# Altium PCB MainBoardPCB_4.PcbDoc (part 19 of 32)
Units mm, origin at the board's own origin, x right, y up, seen from the top; angles counter-clockwise.
Board outline 333.63 x 349.38 mm, 16 copper layers (L1, L2 (GND), L3 (Sign), L4 (GND), L5 (Sign), L6 (PWR/GND), L7(PWR/GND), L8 (Plane_GND), L9 (PWR/GND), L10 (PWR/GND), L11 (PWR/GND), L12 (Sign), L13 (GND), L14 (Sign), L15 (GND), L16), stack 2.502 mm thick; 2205 components, 1648 nets, 8314 pads, 3172 vias.
Unrouted connection lines stored in the file: 5141.
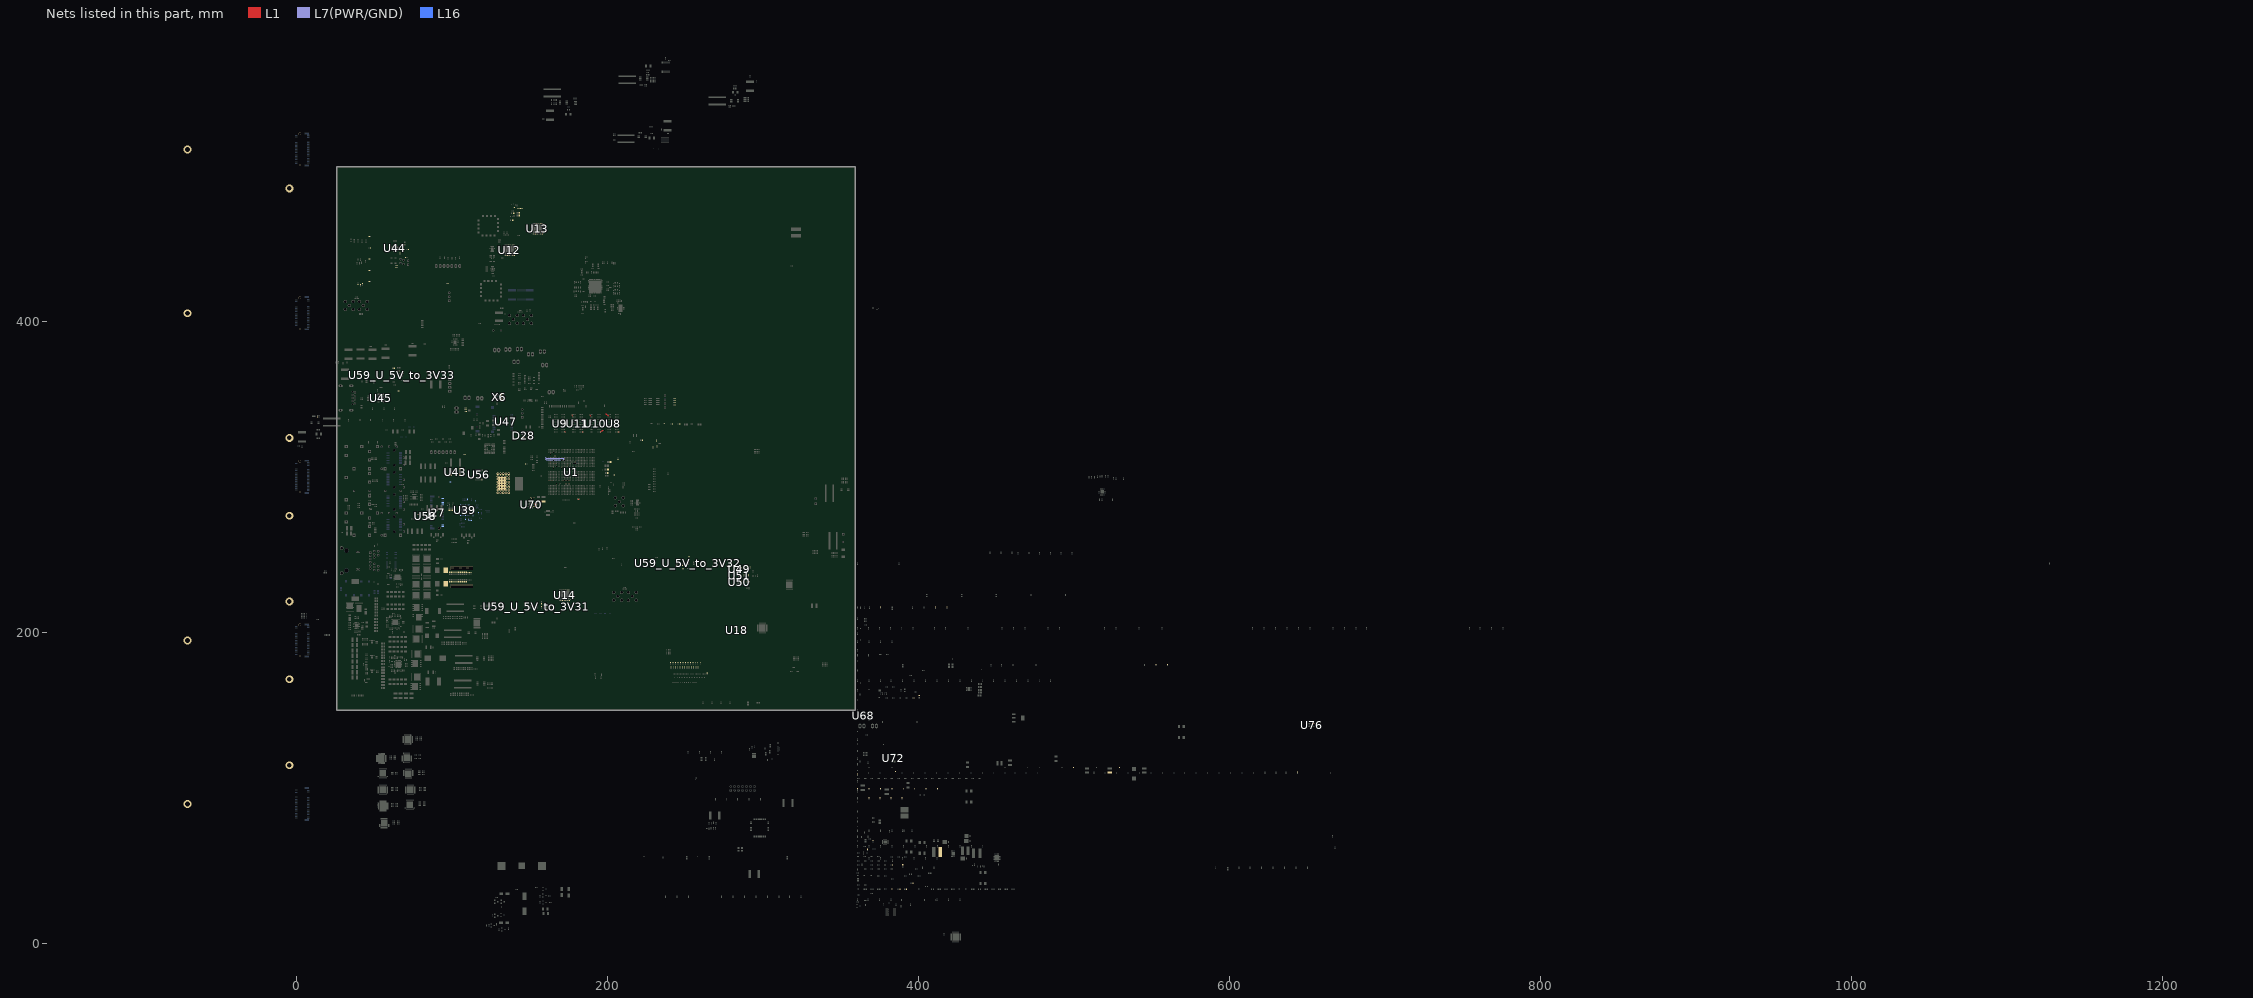
[diagram p21: the nets of this part, all layers, seen from the top]

## Part data (continued)
R667: library part Resistor, "RES SMD 24.9KOHM 0.1% 1/16W 0402", Case/Package=0402, Case Code (Metric)=1005, Manufacturer=Panasonic, Manufacturer Part Number=ERA-2AEB2492X, Max Operating Temperature=155°C, Max Power Dissipation=63mW, Min Operating Temperature=-55°C, Package Quantity=1, Supplier Part Number 1=P24.9KDCCT-ND, Temperature Coefficient=25ppm/°C, Tolerance=0.1%, Voltage Rating=25V, Voltage Rating (DC)=50V, Case Code (Imperial)=0402, Category="Chip SMD Resistors", ComponentLink1Description=http://www.farnell.com/datasheets/2052875.pdf?src-supplier=Farnell, ComponentLink1URL=http://www.farnell.com/datasheets/2052875.pdf?src-supplier=Farnell, ComponentLink2Description=http://components.arrow.com/part/dataview/0323_02931773?src-supplier=Arrow+Europe, ComponentLink2URL=http://components.arrow.com/part/dataview/0323_02931773?src-supplier=Arrow+Europe, ComponentLink3Description=http://www.mouser.com/ds/2/315/AOA0000C237-1100991.pdf?src-supplier=Mouser, ComponentLink3URL=http://www.mouser.com/ds/2/315/AOA0000C237-1100991.pdf?src-supplier=Mouser, ComponentLink4Description=http://industrial.panasonic.com/www-data/pdf/AOA0000/AOA0000CE26.pdf?src-supplier=Avnet+Asia, ComponentLink4URL=http://industrial.panasonic.com/www-data/pdf/AOA0000/AOA0000CE26.pdf?src-supplier=Avnet+Asia, ComponentLink5Description=http://www.onlinecomponents.com/datasheet/era-2aeb2492x.aspx?p=44473673&src-supplier=Onlinecomponents.com, ComponentLink5URL=http://www.onlinecomponents.com/datasheet/era-2aeb2492x.aspx?p=44473673&src-supplier=Onlinecomponents.com, ComponentLink6Description=https://industrial.panasonic.com/cdbs/www-data/pdf/RDM0000/AOA0000C307.pdf?src-supplier=Digi-Key, ComponentLink6URL=https://industrial.panasonic.com/cdbs/www-data/pdf/RDM0000/AOA0000C307.pdf?src-supplier=Digi-Key, ComponentLink7Description=http://www.farnell.com/datasheets/2052875.pdf?src-supplier=Newark, ComponentLink7URL=http://www.farnell.com/datasheets/2052875.pdf?src-supplier=Newark, ComponentLink8Description=http://www.farnell.com/datasheets/1818319.pdf?src-supplier=Element14, ComponentLink8URL=http://www.farnell.com/datasheets/1818319.pdf?src-supplier=Element14, Composition="Thin Film,Metal Film", Contact Plating=Tin, Depth=0.5mm, Features="Automotive AEC-Q200", Height=0.016inch, Lead Free="Lead Free", Length=1mm, Military Standard=Not, Mount="Surface Mount", Number of Terminations=2, Packaging="Tape and Reel", Power Rating=63mW, Pricing 1="1=0,45000, 10=0,32100, 100=0,12830, 1000=0,06322, 2500=0,05858, 5000=0,05300 (USD)", REACH SVHC=Unknown, Resistance=24.9kR, RoHS=Yes, Stock 1=58145, Supplier 1=Digi-Key, Termination=Wraparound, Width=0.02inch
R668 R676 R745: library part Resistor, "RES SMD 20K OHM 1% 1/16W 0402", Case/Package=0402, Case Code (Metric)=1005, Manufacturer=Vishay, Manufacturer Part Number=CRCW040220K0FKED, Max Operating Temperature=155°C, Max Power Dissipation=63mW, Min Operating Temperature=-55°C, Package Quantity=10, Supplier Part Number 1=51X8496, Temperature Coefficient=100ppm/°C, Tolerance=1%, Voltage Rating=50V, Case Code (Imperial)=0402, Category="Chip SMD Resistors", ComponentLink1Description=https://datasheet.ciiva.com/11810/0900766b80d98824-11810023.pdf?src-supplier=RSComponents, ComponentLink1URL=https://datasheet.ciiva.com/11810/0900766b80d98824-11810023.pdf?src-supplier=RSComponents, ComponentLink2Description=https://datasheet.ciiva.com/2463/dcrcwe3-2463139.pdf?src-supplier=Digi-Key, ComponentLink2URL=https://datasheet.ciiva.com/2463/dcrcwe3-2463139.pdf?src-supplier=Digi-Key, ComponentLink3Description=https://datasheet.ciiva.com/2463/dcrcwe3-2463140.pdf?src-supplier=Digi-Key, ComponentLink3URL=https://datasheet.ciiva.com/2463/dcrcwe3-2463140.pdf?src-supplier=Digi-Key, ComponentLink4Description=https://datasheet.ciiva.com/16886/dcrcwe3-16886581.pdf?src-supplier=Avnet+Europe, ComponentLink4URL=https://datasheet.ciiva.com/16886/dcrcwe3-16886581.pdf?src-supplier=Avnet+Europe, ComponentLink5Description=https://datasheet.ciiva.com/15159/getdatasheetpartid-93312-15159927.pdf?src-supplier=Verical, ComponentLink5URL=https://datasheet.ciiva.com/15159/getdatasheetpartid-93312-15159927.pdf?src-supplier=Verical, ComponentLink6Description=https://datasheet.ciiva.com/2463/dcrcwe3-2463141.pdf?src-supplier=Digi-Key, ComponentLink6URL=https://datasheet.ciiva.com/2463/dcrcwe3-2463141.pdf?src-supplier=Digi-Key, ComponentLink7Description=https://datasheet.ciiva.com/3256/dcrcwe3-3256213.pdf?src-supplier=Avnet, ComponentLink7URL=https://datasheet.ciiva.com/3256/dcrcwe3-3256213.pdf?src-supplier=Avnet, ComponentLink8Description=https://datasheet.ciiva.com/16725/70201119-16725214.pdf?src-supplier=Allied+Electronics, ComponentLink8URL=https://datasheet.ciiva.com/16725/70201119-16725214.pdf?src-supplier=Allied+Electronics, Composition="Thick Film", Contact Plating=Tin, Depth=0.5mm, Features="Automotive AEC-Q200", Height=0.35mm, Lead Free="Lead Free", Length=1mm, Military Standard=Not, Mount="Surface Mount", Number of Pins=2, Number of Terminations=2, Packaging="Tape and Reel", Power Rating=63mW, Radiation Hardening=No, REACH SVHC=Unknown, Resistance=20kR, RoHS=Yes, Supplier 1=Newark, Termination=SMD/SMT, Voltage Rating (DC)=50V, Weight=2.3E-05oz, Width=0.5mm, Working Voltage=50V
R671 R673: library part Resistor, Case/Package=0402, Case Code (Metric)=1005, Manufacturer=Panasonic, Manufacturer Part Number=ERA-2AEB1871X, Max Operating Temperature=155°C, Max Power Dissipation=63mW, Min Operating Temperature=-55°C, Package Quantity=10000, Power Rating=62.5mW, Supplier Part Number 1=P1.87KDCCT-ND, Temperature Coefficient=25ppm/°C, Tolerance=0.1%, Case Code (Imperial)=0402, ComponentLink1Description=https://media.digikey.com/pdf/Data%20Sheets/Panasonic%20Resistors%20Thermistors%20PDFs/ERA_Series_LE.pdf?src-supplier=Digi-Key, ComponentLink1URL=https://media.digikey.com/pdf/Data%20Sheets/Panasonic%20Resistors%20Thermistors%20PDFs/ERA_Series_LE.pdf?src-supplier=Digi-Key, ComponentLink2Description=http://components.arrow.com/part/dataview/48289000S454828N1386?src-supplier=Arrow, ComponentLink2URL=http://components.arrow.com/part/dataview/48289000S454828N1386?src-supplier=Arrow, ComponentLink3Description=http://www.mouser.com/ds/2/315/AOA0000C237-1100991.pdf?src-supplier=Mouser, ComponentLink3URL=http://www.mouser.com/ds/2/315/AOA0000C237-1100991.pdf?src-supplier=Mouser, ComponentLink4Description=http://www.onlinecomponents.com/datasheet/era-2aeb1871x.aspx?p=44473586&src-supplier=Onlinecomponents.com, ComponentLink4URL=http://www.onlinecomponents.com/datasheet/era-2aeb1871x.aspx?p=44473586&src-supplier=Onlinecomponents.com, ComponentLink5Description=https://industrial.panasonic.com/cdbs/www-data/pdf/RDM0000/AOA0000C307.pdf?src-supplier=Digi-Key, ComponentLink5URL=https://industrial.panasonic.com/cdbs/www-data/pdf/RDM0000/AOA0000C307.pdf?src-supplier=Digi-Key, Composition="Thin Film", Height=0.016inch, Lead Free="Lead Free", Length=0.039inch, Mount="Surface Mount", Number of Terminations=2, Packaging="Tape and Reel", Pricing 1="1 = 0,45000, 10 = 0,32100, 100 = 0,12830, 1000 = 0,06322, 2500 = 0,05858, 5000 = 0,05300 (USD)", Resistance=1.87kR, RoHS=Yes, Stock 1=25484, Supplier 1=Digi-Key, Width=0.02inch
R672: library part Resistor, Case/Package=0402, Case Code (Metric)=1005, Manufacturer=Panasonic, Manufacturer Part Number=ERA-2AEB152X, Max Operating Temperature=155°C, Max Power Dissipation=63mW, Min Operating Temperature=-55°C, Package Quantity=10000, Supplier Part Number 1=P1.5KDCCT-ND, Temperature Coefficient=25ppm/°C, Tolerance=0.1%, Voltage Rating=25V, Case Code (Imperial)=0402, ComponentLink1Description=https://datasheet.ciiva.com/11812/0900766b80beefcc-11812726.pdf?src-supplier=RSComponents, ComponentLink1URL=https://datasheet.ciiva.com/11812/0900766b80beefcc-11812726.pdf?src-supplier=RSComponents, ComponentLink2Description=https://datasheet.ciiva.com/9198/aoa0000ce26-9198134.pdf?src-supplier=Avnet, ComponentLink2URL=https://datasheet.ciiva.com/9198/aoa0000ce26-9198134.pdf?src-supplier=Avnet, ComponentLink3Description=https://datasheet.ciiva.com/17214/aoa0000ce26-17214729.pdf?src-supplier=Avnet+Europe, ComponentLink3URL=https://datasheet.ciiva.com/17214/aoa0000ce26-17214729.pdf?src-supplier=Avnet+Europe, ComponentLink4Description=https://datasheet.ciiva.com/24071/aoa0000ce26-197354-24071641.pdf?src-supplier=Mouser, ComponentLink4URL=https://datasheet.ciiva.com/24071/aoa0000ce26-197354-24071641.pdf?src-supplier=Mouser, Composition="Thin Film,Metal Film", Contact Plating=Tin, Depth=0.5mm, Features="Automotive AEC-Q200", Height=0.35mm, Lead Free="Lead Free", Length=1mm, Military Standard=Not, Mount="Surface Mount", Number of Terminations=2, Packaging="Tape and Reel", Power Rating=63mW, Pricing 1="1 = 0,43000, 10 = 0,30500, 100 = 0,12220, 1000 = 0,06021, 2500 = 0,05579, 5000 = 0,05047 (USD)", Radiation Hardening=No, REACH SVHC="No SVHC", Resistance=1.5kR, RoHS=Yes, Stock 1=3629, Supplier 1=Digi-Key, Termination=SMD/SMT, Voltage Rating (DC)=25V, Width=0.02inch
R674: library part Resistor, Case/Package=0402, Case Code (Metric)=1005, Manufacturer=Panasonic, Manufacturer Part Number=ERA-2AEB153X, Max Operating Temperature=155°C, Max Power Dissipation=63mW, Min Operating Temperature=-55°C, Package Quantity=1, Supplier Part Number 1=P15KDCCT-ND, Temperature Coefficient=25ppm/°C, Tolerance=0.1%, Voltage Rating=25V, Case Code (Imperial)=0402, ComponentLink1Description=https://datasheet.ciiva.com/11811/0900766b80beefcc-11811837.pdf?src-supplier=RSComponents, ComponentLink1URL=https://datasheet.ciiva.com/11811/0900766b80beefcc-11811837.pdf?src-supplier=RSComponents, ComponentLink2Description=https://datasheet.ciiva.com/28681/1776116-28681526.pdf?src-supplier=Element14, ComponentLink2URL=https://datasheet.ciiva.com/28681/1776116-28681526.pdf?src-supplier=Element14, ComponentLink3Description=https://datasheet.ciiva.com/16781/70068849-16781564.pdf?src-supplier=Allied+Electronics, ComponentLink3URL=https://datasheet.ciiva.com/16781/70068849-16781564.pdf?src-supplier=Allied+Electronics, ComponentLink4Description=https://datasheet.ciiva.com/22640/328837-22640606.pdf?src-supplier=Farnell, ComponentLink4URL=https://datasheet.ciiva.com/22640/328837-22640606.pdf?src-supplier=Farnell, ComponentLink5Description=https://datasheet.ciiva.com/22737/1776116-22737247.pdf?src-supplier=Element14, ComponentLink5URL=https://datasheet.ciiva.com/22737/1776116-22737247.pdf?src-supplier=Element14, ComponentLink6Description=https://datasheet.ciiva.com/16395/aoa0000ce26-16395304.pdf?src-supplier=Future+Electronics, ComponentLink6URL=https://datasheet.ciiva.com/16395/aoa0000ce26-16395304.pdf?src-supplier=Future+Electronics, ComponentLink7Description=https://datasheet.ciiva.com/25723/1776116-25723355.pdf?src-supplier=Farnell, ComponentLink7URL=https://datasheet.ciiva.com/25723/1776116-25723355.pdf?src-supplier=Farnell, ComponentLink8Description=https://datasheet.ciiva.com/7657/328837-7657353.pdf?src-supplier=Element14, ComponentLink8URL=https://datasheet.ciiva.com/7657/328837-7657353.pdf?src-supplier=Element14, Composition="Thin Film,Metal Film", Contact Plating=Tin, Depth=0.5mm, Height=0.35mm, Lead Free="Lead Free", Length=1mm, Military Standard=Not, Mount="Surface Mount", Number of Pins=2, Number of Terminations=2, Packaging="Tape and Reel", Power Rating=63mW, Pricing 1="1 = 0,45000, 10 = 0,32100, 100 = 0,12830, 1000 = 0,06322, 2500 = 0,05858, 5000 = 0,05300 (USD)", Radiation Hardening=No, REACH SVHC=Unknown, Resistance=15kR, RoHS=Yes, Stock 1=84966, Supplier 1=Digi-Key, Termination=SMD/SMT, Voltage Rating (DC)=25V, Width=0.02inch
R682: library part Resistor, Case/Package=0402, Case Code (Metric)=1005, Manufacturer 1=Yageo, Manufacturer Part Number 1=RC0402FR-077K5L, Max Operating Temperature=155°C, Max Power Dissipation=63mW, Min Operating Temperature=-55°C, Package Quantity=1, Supplier Part Number 1=311-7.50KLRCT-ND, Temperature Coefficient=100ppm/°C, Tolerance=1%, Voltage Rating=50V, Case Code (Imperial)=0402, ComponentLink1Description=https://datasheet.ciiva.com/2519/pyu-r-int-thick-7-2519057.pdf?src-supplier=Digi-Key, ComponentLink1URL=https://datasheet.ciiva.com/2519/pyu-r-int-thick-7-2519057.pdf?src-supplier=Digi-Key, ComponentLink2Description=https://datasheet.ciiva.com/2519/pyu-r-int-thick-7-2519058.pdf?src-supplier=Digi-Key, ComponentLink2URL=https://datasheet.ciiva.com/2519/pyu-r-int-thick-7-2519058.pdf?src-supplier=Digi-Key, ComponentLink3Description=https://datasheet.ciiva.com/2519/pyu-r-int-thick-7-2519059.pdf?src-supplier=Digi-Key, ComponentLink3URL=https://datasheet.ciiva.com/2519/pyu-r-int-thick-7-2519059.pdf?src-supplier=Digi-Key, ComponentLink4Description=https://datasheet.ciiva.com/12667/pyu-rc0402-51-rohs-l-6-r-12667366.pdf?src-supplier=Mouser, ComponentLink4URL=https://datasheet.ciiva.com/12667/pyu-rc0402-51-rohs-l-6-r-12667366.pdf?src-supplier=Mouser, ComponentLink5Description=https://datasheet.ciiva.com/15189/getdatasheetpartid-330684-15189510.pdf?src-supplier=Verical, ComponentLink5URL=https://datasheet.ciiva.com/15189/getdatasheetpartid-330684-15189510.pdf?src-supplier=Verical, ComponentLink6Description=https://datasheet.ciiva.com/7983/1018594-7983527.pdf?src-supplier=Element14, ComponentLink6URL=https://datasheet.ciiva.com/7983/1018594-7983527.pdf?src-supplier=Element14, ComponentLink7Description=https://datasheet.ciiva.com/46394/1018594-46394939.pdf?src-supplier=Element14, ComponentLink7URL=https://datasheet.ciiva.com/46394/1018594-46394939.pdf?src-supplier=Element14, ComponentLink8Description=https://datasheet.ciiva.com/16741/pyu-rc0402-51-rohs-l-6-r-16741132.pdf?src-supplier=Future+Electronics, ComponentLink8URL=https://datasheet.ciiva.com/16741/pyu-rc0402-51-rohs-l-6-r-16741132.pdf?src-supplier=Future+Electronics, ComponentLink9Description=https://datasheet.ciiva.com/7850/1018594-7850095.pdf?src-supplier=Element14, ComponentLink9URL=https://datasheet.ciiva.com/7850/1018594-7850095.pdf?src-supplier=Element14, Composition="Thick Film", Depth=0.5mm, Features="Moisture Resistant", Height=0.016inch, Lead Free="Lead Free", Length=1mm, Military Standard=Not, Number of Terminations=2, Packaging="Tape and Reel", Power Rating=63mW, Pricing 1="1=0,10000, 10=0,01600, 100=0,00640, 1000=0,00289, 2500=0,00251, 5000=0,00207 (USD)", REACH SVHC=Unknown, Resistance=7.5kR, RoHS=Yes, Stock 1=1482437, Supplier 1=Digi-Key, Termination=SMD/SMT, Voltage Rating (DC)=50V, Width=0.02inch
R684: library part Resistor, Case/Package=0402, Case Code (Metric)=1005, Manufacturer 1=Yageo, Manufacturer Part Number 1=RC0402FR-077K15L, Max Operating Temperature=155°C, Max Power Dissipation=63mW, Min Operating Temperature=-55°C, Power Rating=62.5mW, Supplier Part Number 1=YAG3235CT-ND, Temperature Coefficient=100ppm/°C, Tolerance=1%, Voltage Rating=50V, Case Code (Imperial)=0402, ComponentLink1Description=https://datasheet.ciiva.com/28407/pyu-rc0402-51-rohs-l-6-28407927.pdf?src-supplier=Avnet+Europe, ComponentLink1URL=https://datasheet.ciiva.com/28407/pyu-rc0402-51-rohs-l-6-28407927.pdf?src-supplier=Avnet+Europe, ComponentLink2Description=https://datasheet.ciiva.com/8892/pyu-rc0402-51-rohs-l-6-8892025.pdf?src-supplier=Avnet, ComponentLink2URL=https://datasheet.ciiva.com/8892/pyu-rc0402-51-rohs-l-6-8892025.pdf?src-supplier=Avnet, ComponentLink3Description=https://datasheet.ciiva.com/17423/pyu-rc0402-51-rohs-l-6-r-17423802.pdf?src-supplier=Future+Electronics, ComponentLink3URL=https://datasheet.ciiva.com/17423/pyu-rc0402-51-rohs-l-6-r-17423802.pdf?src-supplier=Future+Electronics, Composition="Thick Film", Contact Plating=Tin,Matte, Depth=0.5mm, Features="Moisture Resistant", Height=0.016inch, Lead Free="Lead Free", Length=1mm, Military Standard=Not, Number of Terminations=2, Packaging="Tape and Reel", Pricing 1="1=0,10000, 10=0,01600, 100=0,00640, 1000=0,00289, 2500=0,00251, 5000=0,00207 (USD)", Resistance=7.15kR, RoHS=Yes, Stock 1=134068, Supplier 1=Digi-Key, Termination=SMD/SMT, Width=0.02inch
R685: library part Resistor, Case/Package=0402, Case Code (Metric)=1005, Manufacturer 1=Yageo, Manufacturer Part Number 1=RC0402FR-075K9L, Max Operating Temperature=155°C, Max Power Dissipation=63mW, Min Operating Temperature=-55°C, Power Rating=62.5mW, Supplier Part Number 1=YAG3197CT-ND, Temperature Coefficient=100ppm/°C, Tolerance=1%, Voltage Rating=50V, Case Code (Imperial)=0402, ComponentLink1Description=https://datasheet.ciiva.com/8892/pyu-rc0402-51-rohs-l-6-8892440.pdf?src-supplier=Avnet, ComponentLink1URL=https://datasheet.ciiva.com/8892/pyu-rc0402-51-rohs-l-6-8892440.pdf?src-supplier=Avnet, ComponentLink2Description=https://datasheet.ciiva.com/28408/pyu-rc0402-51-rohs-l-6-28408905.pdf?src-supplier=Avnet+Europe, ComponentLink2URL=https://datasheet.ciiva.com/28408/pyu-rc0402-51-rohs-l-6-28408905.pdf?src-supplier=Avnet+Europe, ComponentLink3Description=https://datasheet.ciiva.com/17419/pyu-rc0402-51-rohs-l-6-r-17419542.pdf?src-supplier=Future+Electronics, ComponentLink3URL=https://datasheet.ciiva.com/17419/pyu-rc0402-51-rohs-l-6-r-17419542.pdf?src-supplier=Future+Electronics, ComponentLink4Description=https://datasheet.ciiva.com/12577/pyu-rc0402-51-rohs-l-6-r-12577353.pdf?src-supplier=Mouser, ComponentLink4URL=https://datasheet.ciiva.com/12577/pyu-rc0402-51-rohs-l-6-r-12577353.pdf?src-supplier=Mouser, Composition="Thick Film", Contact Plating=Tin,Matte, Depth=0.5mm, Features="Moisture Resistant", Height=0.016inch, Lead Free="Lead Free", Length=1mm, Military Standard=Not, Number of Terminations=2, Packaging="Tape and Reel", Pricing 1="1=0,10000, 10=0,01600, 100=0,00640, 1000=0,00289, 2500=0,00251, 5000=0,00207 (USD)", Radiation Hardening=No, Resistance=5.9kR, RoHS=Yes, Stock 1=208179, Supplier 1=Digi-Key, Termination=SMD/SMT, Weight=2.3E-05oz, Width=0.02inch
R686: library part Resistor, Case/Package=0402, Case Code (Metric)=1005, Manufacturer=Yageo, Manufacturer Part Number=RC0402FR-07412KL, Max Operating Temperature=155°C, Max Power Dissipation=63mW, Min Operating Temperature=-55°C, Power Rating=62.5mW, Supplier Part Number 1=YAG3153CT-ND, Temperature Coefficient=100ppm/°C, Tolerance=1%, Voltage Rating=50V, Case Code (Imperial)=0402, ComponentLink1Description=https://datasheet.ciiva.com/28390/pyu-rc0402-51-rohs-l-6-28390954.pdf?src-supplier=Avnet+Europe, ComponentLink1URL=https://datasheet.ciiva.com/28390/pyu-rc0402-51-rohs-l-6-28390954.pdf?src-supplier=Avnet+Europe, ComponentLink2Description=https://datasheet.ciiva.com/16857/pyu-rc0402-51-rohs-l-6-16857086.pdf?src-supplier=Avnet+Europe, ComponentLink2URL=https://datasheet.ciiva.com/16857/pyu-rc0402-51-rohs-l-6-16857086.pdf?src-supplier=Avnet+Europe, Composition="Thick Film", Contact Plating=Tin,Matte, Depth=0.5mm, Features="Moisture Resistant", Height=0.016inch, Lead Free="Lead Free", Length=1mm, Military Standard=Not, Number of Terminations=2, Packaging="Tape and Reel", Pricing 1="1 = 0,10000, 10 = 0,01600, 100 = 0,00640, 1000 = 0,00289, 2500 = 0,00251, 5000 = 0,00207 (USD)", Resistance=412kR, RoHS=Yes, Stock 1=185706, Supplier 1=Digi-Key, Termination=SMD/SMT, Voltage Rating (DC)=50V, Weight=2.3E-05oz, Width=0.5mm
R687: library part Resistor, Case/Package=0402, Case Code (Metric)=1005, Manufacturer=Panasonic, Manufacturer Part Number=ERA-2AEB5762X, Max Operating Temperature=155°C, Max Power Dissipation=63mW, Min Operating Temperature=-55°C, Package Quantity=1, Power Rating=62.5mW, Supplier Part Number 1=P57.6KDCCT-ND, Temperature Coefficient=25ppm/°C, Tolerance=0.1%, Voltage Rating=50V, Case Code (Imperial)=0402, ComponentLink1Description=https://media.digikey.com/pdf/Data%20Sheets/Panasonic%20Resistors%20Thermistors%20PDFs/ERA_Series_LE.pdf?src-supplier=Digi-Key, ComponentLink1URL=https://media.digikey.com/pdf/Data%20Sheets/Panasonic%20Resistors%20Thermistors%20PDFs/ERA_Series_LE.pdf?src-supplier=Digi-Key, ComponentLink2Description=http://www.farnell.com/datasheets/2052875.pdf?src-supplier=Farnell, ComponentLink2URL=http://www.farnell.com/datasheets/2052875.pdf?src-supplier=Farnell, ComponentLink3Description=http://www.mouser.com/ds/2/315/AOA0000C237-1100991.pdf?src-supplier=Mouser, ComponentLink3URL=http://www.mouser.com/ds/2/315/AOA0000C237-1100991.pdf?src-supplier=Mouser, ComponentLink4Description=http://www.farnell.com/datasheets/2052875.pdf?src-supplier=Newark, ComponentLink4URL=http://www.farnell.com/datasheets/2052875.pdf?src-supplier=Newark, ComponentLink5Description=http://www.onlinecomponents.com/datasheet/era-2aeb5762x.aspx?p=44473802&src-supplier=Onlinecomponents.com, ComponentLink5URL=http://www.onlinecomponents.com/datasheet/era-2aeb5762x.aspx?p=44473802&src-supplier=Onlinecomponents.com, ComponentLink6Description=https://industrial.panasonic.com/cdbs/www-data/pdf/RDM0000/AOA0000C307.pdf?src-supplier=Digi-Key, ComponentLink6URL=https://industrial.panasonic.com/cdbs/www-data/pdf/RDM0000/AOA0000C307.pdf?src-supplier=Digi-Key, ComponentLink7Description=http://www.farnell.com/datasheets/1818319.pdf?src-supplier=Element14, ComponentLink7URL=http://www.farnell.com/datasheets/1818319.pdf?src-supplier=Element14, Composition="Thin Film", Features="Automotive AEC-Q200", Height=0.016inch, Lead Free="Lead Free", Length=0.039inch, Mount="Surface Mount", Number of Terminations=2, Packaging="Tape and Reel", Pricing 1="1 = 0,45000, 10 = 0,32100, 100 = 0,12830, 1000 = 0,06322, 2500 = 0,05858, 5000 = 0,05300 (USD)", REACH SVHC=Unknown, Resistance=57.6kR, RoHS=Yes, Stock 1=25735, Supplier 1=Digi-Key, Voltage Rating (DC)=50V, Width=0.02inch
R689 R691 R838 R840 R841: library part Resistor, Case/Package=0402, Case Code (Metric)=1005, Manufacturer=Panasonic, Manufacturer Part Number=ERJ-2RKF2002X, Max Operating Temperature=155°C, Max Power Dissipation=100mW, Min Operating Temperature=-55°C, Package Quantity=1, Supplier Part Number 1=P20.0KLCT-ND, Temperature Coefficient=100ppm/°C, Tolerance=1%, Voltage Rating=50V, Case Code (Imperial)=0402, ComponentLink1Description=https://datasheet.ciiva.com/11821/0900766b80f80784-11821220.pdf?src-supplier=RSComponents, ComponentLink1URL=https://datasheet.ciiva.com/11821/0900766b80f80784-11821220.pdf?src-supplier=RSComponents, ComponentLink2Description=https://datasheet.ciiva.com/16762/70260748-16762885.pdf?src-supplier=Allied+Electronics, ComponentLink2URL=https://datasheet.ciiva.com/16762/70260748-16762885.pdf?src-supplier=Allied+Electronics, ComponentLink3Description=https://datasheet.ciiva.com/16782/70260748-16782455.pdf?src-supplier=Allied+Electronics, ComponentLink3URL=https://datasheet.ciiva.com/16782/70260748-16782455.pdf?src-supplier=Allied+Electronics, ComponentLink4Description=https://datasheet.ciiva.com/48531/aoa0000ce2-48531063.pdf?src-supplier=Avnet, ComponentLink4URL=https://datasheet.ciiva.com/48531/aoa0000ce2-48531063.pdf?src-supplier=Avnet, ComponentLink5Description=https://datasheet.ciiva.com/28688/1678782-28688600.pdf?src-supplier=Element14, ComponentLink5URL=https://datasheet.ciiva.com/28688/1678782-28688600.pdf?src-supplier=Element14, ComponentLink6Description=https://datasheet.ciiva.com/46377/426256-46377368.pdf?src-supplier=Element14, ComponentLink6URL=https://datasheet.ciiva.com/46377/426256-46377368.pdf?src-supplier=Element14, ComponentLink7Description=https://datasheet.ciiva.com/6138/426256-6138761.pdf?src-supplier=Farnell, ComponentLink7URL=https://datasheet.ciiva.com/6138/426256-6138761.pdf?src-supplier=Farnell, ComponentLink8Description=https://datasheet.ciiva.com/24159/aoa0000ce2-24159274.pdf?src-supplier=Mouser, ComponentLink8URL=https://datasheet.ciiva.com/24159/aoa0000ce2-24159274.pdf?src-supplier=Mouser, ComponentLink9Description=https://datasheet.ciiva.com/16508/aoa0000ce2-16508524.pdf?src-supplier=Future+Electronics, ComponentLink9URL=https://datasheet.ciiva.com/16508/aoa0000ce2-16508524.pdf?src-supplier=Future+Electronics, ComponentLink10Description=https://datasheet.ciiva.com/16514/aoa0000ce2-16514269.pdf?src-supplier=Avnet+Asia, ComponentLink10URL=https://datasheet.ciiva.com/16514/aoa0000ce2-16514269.pdf?src-supplier=Avnet+Asia, ComponentLink11Description=https://datasheet.ciiva.com/30049/aoa0000ce2-30049982.pdf?src-supplier=Onlinecomponents.com, ComponentLink11URL=https://datasheet.ciiva.com/30049/aoa0000ce2-30049982.pdf?src-supplier=Onlinecomponents.com, Composition="Thick Film", Contact Plating=Tin, Depth=0.5mm, Features="Automotive AEC-Q200", Height=0.35mm, Lead Free="Lead Free", Length=1mm, Military Standard=Not, Mount="Surface Mount", Number of Terminations=2, Packaging="Cut Tape", Power Rating=100mW, Pricing 1="1 = 0,10000, 10 = 0,05000, 100 = 0,02050, 1000 = 0,00920, 2500 = 0,00798, 5000 = 0,00660 (USD)", Radiation Hardening=No, REACH SVHC="No SVHC", Resistance=20kR, RoHS=Yes, Stock 1=2516725, Supplier 1=Digi-Key, Termination=SMD/SMT, Voltage Rating (DC)=50V, Weight=2.8E-05oz, Width=0.02inch
R695: library part Resistor, Case/Package=0402, Case Code (Metric)=1005, Manufacturer=Panasonic, Manufacturer Part Number=ERA-2AEB101X, Max Operating Temperature=155°C, Max Power Dissipation=63mW, Min Operating Temperature=-55°C, Package Quantity=10000, Supplier Part Number 1=P100DCCT-ND, Temperature Coefficient=25ppm/°C, Tolerance=0.1%, Voltage Rating=25V, Case Code (Imperial)=0402, ComponentLink1Description=https://datasheet.ciiva.com/11812/0900766b80beefcc-11812073.pdf?src-supplier=RSComponents, ComponentLink1URL=https://datasheet.ciiva.com/11812/0900766b80beefcc-11812073.pdf?src-supplier=RSComponents, ComponentLink2Description=https://datasheet.ciiva.com/16395/aoa0000ce26-16395302.pdf?src-supplier=Future+Electronics, ComponentLink2URL=https://datasheet.ciiva.com/16395/aoa0000ce26-16395302.pdf?src-supplier=Future+Electronics, ComponentLink3Description=https://datasheet.ciiva.com/16764/70068849-16764746.pdf?src-supplier=Allied+Electronics, ComponentLink3URL=https://datasheet.ciiva.com/16764/70068849-16764746.pdf?src-supplier=Allied+Electronics, ComponentLink4Description=https://datasheet.ciiva.com/46401/328837-46401709.pdf?src-supplier=Element14, ComponentLink4URL=https://datasheet.ciiva.com/46401/328837-46401709.pdf?src-supplier=Element14, ComponentLink5Description=https://datasheet.ciiva.com/30085/54aoa0000ce26-30085054.pdf?src-supplier=Onlinecomponents.com, ComponentLink5URL=https://datasheet.ciiva.com/30085/54aoa0000ce26-30085054.pdf?src-supplier=Onlinecomponents.com, ComponentLink6Description=https://datasheet.ciiva.com/43602/328837-43602222.pdf?src-supplier=Farnell, ComponentLink6URL=https://datasheet.ciiva.com/43602/328837-43602222.pdf?src-supplier=Farnell, ComponentLink7Description=https://datasheet.ciiva.com/17207/aoa0000ce26-17207957.pdf?src-supplier=Avnet+Europe, ComponentLink7URL=https://datasheet.ciiva.com/17207/aoa0000ce26-17207957.pdf?src-supplier=Avnet+Europe, ComponentLink8Description=https://datasheet.ciiva.com/22640/328837-22640603.pdf?src-supplier=Farnell, ComponentLink8URL=https://datasheet.ciiva.com/22640/328837-22640603.pdf?src-supplier=Farnell, ComponentLink9Description=https://datasheet.ciiva.com/16511/aoa0000ce26-16511564.pdf?src-supplier=Avnet+Asia, ComponentLink9URL=https://datasheet.ciiva.com/16511/aoa0000ce26-16511564.pdf?src-supplier=Avnet+Asia, ComponentLink10Description=https://datasheet.ciiva.com/22730/1776116-22730668.pdf?src-supplier=Element14, ComponentLink10URL=https://datasheet.ciiva.com/22730/1776116-22730668.pdf?src-supplier=Element14, Composition="Metal Film,Thin Film", Contact Plating=Tin, Depth=0.5mm, Features="Automotive AEC-Q200", Height=0.35mm, Lead Free="Lead Free", Length=1mm, Military Standard=Not, Mount="Surface Mount", Number of Pins=2, Number of Terminations=2, Packaging="Tape and Reel", Power Rating=63mW, Pricing 1="1 = 0,45000, 10 = 0,32100, 100 = 0,12830, 1000 = 0,06322, 2500 = 0,05858, 5000 = 0,05300 (USD)", Radiation Hardening=No, REACH SVHC="No SVHC", Resistance=100R, RoHS=Yes, Stock 1=854158, Supplier 1=Digi-Key, Termination=SMD/SMT, Voltage Rating (DC)=25V, Width=0.5mm
R716 R717 R718 R719 R720: library part Resistor, "Thick Film Resistors 0402 261ohms 1% AEC-Q200", Case/Package=0402, Case Code (Metric)=1005, Manufacturer=Panasonic, Manufacturer Part Number=ERJ-2RKF2610X, Max Operating Temperature=155°C, Max Power Dissipation=100mW, Min Operating Temperature=-55°C, Package Quantity=1, Supplier Part Number 1=P261LCT-ND, Temperature Coefficient=100ppm/°C, Tolerance=1%, Voltage Rating=50V, Case Code (Imperial)=0402, Category="Chip SMD Resistors", ComponentLink1Description=https://datasheet.ciiva.com/9183/aoa0000ce2-9183704.pdf?src-supplier=Avnet, ComponentLink1URL=https://datasheet.ciiva.com/9183/aoa0000ce2-9183704.pdf?src-supplier=Avnet, ComponentLink2Description=https://datasheet.ciiva.com/22673/1678782-22673517.pdf?src-supplier=Element14, ComponentLink2URL=https://datasheet.ciiva.com/22673/1678782-22673517.pdf?src-supplier=Element14, ComponentLink3Description=https://datasheet.ciiva.com/22720/1678782-22720861.pdf?src-supplier=Farnell, ComponentLink3URL=https://datasheet.ciiva.com/22720/1678782-22720861.pdf?src-supplier=Farnell, ComponentLink4Description=https://datasheet.ciiva.com/22673/1678782-22673518.pdf?src-supplier=Element14, ComponentLink4URL=https://datasheet.ciiva.com/22673/1678782-22673518.pdf?src-supplier=Element14, ComponentLink5Description=https://datasheet.ciiva.com/7903/1678782-7903407.pdf?src-supplier=Element14, ComponentLink5URL=https://datasheet.ciiva.com/7903/1678782-7903407.pdf?src-supplier=Element14, ComponentLink6Description=https://datasheet.ciiva.com/24160/aoa0000ce2-24160255.pdf?src-supplier=Mouser, ComponentLink6URL=https://datasheet.ciiva.com/24160/aoa0000ce2-24160255.pdf?src-supplier=Mouser, Composition="Thick Film", Contact Plating=Tin, Depth=0.5mm, Features="Automotive AEC-Q200", Height=0.016inch, Lead Free="Lead Free", Length=1mm, Military Standard=Not, Mount="Surface Mount", Number of Terminations=2, Packaging="Tape and Reel", Power Rating=100mW, Pricing 1="1=0,10000, 10=0,04100, 100=0,01670, 1000=0,00751, 2500=0,00652, 5000=0,00538 (USD)", REACH SVHC="No SVHC", Resistance=261R, RoHS=Yes, Stock 1=1010472, Supplier 1=Digi-Key, Termination=SMD/SMT, Voltage Rating (DC)=50V, Weight=2.8E-05oz, Width=0.02inch
R764: "RES 0.004 OHM 1% 10W 2818", Case/Package=Nonstandard, Manufacturer=Vishay, Max Operating Temperature=170°C, Max Power Dissipation=10W, Min Operating Temperature=-65°C, Resistance=4mR, Supplier Part Number 1=541-3274-1-ND, Temperature Coefficient=200ppm/°C, Tolerance=1%, ComponentLink1Description=http://www.farnell.com/datasheets/2207403.pdf?src-supplier=Farnell, ComponentLink1URL=http://www.farnell.com/datasheets/2207403.pdf?src-supplier=Farnell, ComponentLink2Description=http://www.vishay.com/docs/30347/wshp2818.pdf?src-supplier=Digi-Key, ComponentLink2URL=http://www.vishay.com/docs/30347/wshp2818.pdf?src-supplier=Digi-Key, ComponentLink3Description=http://www.farnell.com/datasheets/2207403.pdf?src-supplier=Newark, ComponentLink3URL=http://www.farnell.com/datasheets/2207403.pdf?src-supplier=Newark, Composition="Metal Element", Features="Moisture Resistant,Automotive AEC-Q200", Manufacturer Part Number=WSHP28184L000FEA, Number of Terminations=2, Packaging="Tape and Reel", Pricing 1="1 = 2,42000, 10 = 2,14700, 25 = 1,99080, 50 = 1,87380, 100 = 1,63960, 250 = 1,40540, 500 = 1,17118, 1000 = 1,01501 (USD)", RoHS=No, Stock 1=14, Supplier 1=Digi-Key
S1 S5: library part "SW DIP-4", Code_IPC=SOIC127P600-8, Code_JEDEC=MS-012-AA, LatestRevisionDate=29-May-2009, LatestRevisionNote="IPC-7351 Footprint Added.", PackageDescription="8-Pin Small Outline Integrated Circuit 1.27 mm Pitch", PackageReference=SO8, PackageVersion=Dec-2002, Published=24-Mar-1999, Publisher="Altium Limited"
S2 S3 S4 S6 S7: "WS-TASV SMT Tact Switch 4.5x4.5mm, height 3.8mm, 160gf", Operating Temperature="-40 to +85degC", Rated Current=50mA, Rated Voltage=12VDC, ComponentLink1Description=Manufacturer, ComponentLink1URL=http://www.we-online.de, ComponentLink2Description=Datasheet, ComponentLink2URL=https://katalog.we-online.com/em/datasheet/430181038816.pdf, Contact Material="Stainless Steel", Contact Plating=Silver, Height=3.8mm, Mounting Technology=SMT, Operation Force=160gf, Packaging="Tape and Reel", Part Number=430181038816, Published Date="September 2019", Publisher="Wurth Elektronik", Terminal Material="Copper Alloy", Terminal Plating=Silver, Washable=No
T5 T6 T9 T10 T13 T15 T17 T19: "MOSFET N-CH 30V 53A TDSON-8", Continuous Drain Current (ID)=53A, Drain to Source Breakdown Voltage=30V, Drain to Source Resistance=8mR, Gate to Source Voltage (Vgs)=20V, Input Capacitance=1.7nF, Manufacturer 1=Infineon, Max Operating Temperature=150°C, Max Power Dissipation=35W, Min Operating Temperature=-55°C, Package Quantity=1, Power Dissipation=2.5W, Supplier Part Number 1=BSC080N03LSGATMA1CT-ND, Threshold Voltage=2.2V, ComponentLink1Description=https://datasheet.ciiva.com/1189/infineon-bsc080n03ls-ds-v02-01-en-1189645.pdf?src-supplier=Element14, ComponentLink1URL=https://datasheet.ciiva.com/1189/infineon-bsc080n03ls-ds-v02-01-en-1189645.pdf?src-supplier=Element14, ComponentLink2Description=https://datasheet.ciiva.com/26789/bsc080n03ls-g-26789476.pdf?src-supplier=IIIC, ComponentLink2URL=https://datasheet.ciiva.com/26789/bsc080n03ls-g-26789476.pdf?src-supplier=IIIC, Drain to Source Voltage (Vdss)=30V, Element Configuration=Single, Fall Time=2.6ns, Halogen Free="Halogen Free", Height=1.1mm, Length=6.35mm, Manufacturer Part Number 1=BSC080N03LSG, Number of Pins=8, Packaging="Tape and Reel", Pricing 1="1=0,70000, 10=0,61600, 100=0,42020, 500=0,35108, 1000=0,29878 (USD)", Rds On Max=8mR, REACH SVHC="No SVHC", Rise Time=2.8ns, RoHS=Yes, Stock 1=16105, Supplier 1=Digi-Key, Turn-Off Delay Time=15ns, Turn-On Delay Time=3.3ns, Width=5.35mm
T7 T8 T11 T12 T14 T16 T18 T20: "MOSFET, N CH, 100A, 30V, PG-TDSON-8", Case/Package=TO-252-3, Continuous Drain Current (ID)=100A, Drain to Source Breakdown Voltage=30V, Drain to Source Resistance=4.7mR, Gate to Source Voltage (Vgs)=20V, Input Capacitance=4.3nF, Manufacturer 1=Infineon, Max Operating Temperature=150°C, Max Power Dissipation=69W, Min Operating Temperature=-55°C, Package Quantity=5000, Power Dissipation=2.5W, Supplier Part Number 1="BSC030N03LS G-ND", Threshold Voltage=1V, ComponentLink1Description=https://datasheet.ciiva.com/26896/getdatasheetpartid-635090-26896521.pdf?src-supplier=Verical, ComponentLink1URL=https://datasheet.ciiva.com/26896/getdatasheetpartid-635090-26896521.pdf?src-supplier=Verical, ComponentLink2Description=https://datasheet.ciiva.com/26790/bsc030n03ls-g-26790009.pdf?src-supplier=IIIC, ComponentLink2URL=https://datasheet.ciiva.com/26790/bsc030n03ls-g-26790009.pdf?src-supplier=IIIC, ComponentLink3Description=https://datasheet.ciiva.com/6368/bsc030n03ls-rev1-27-6368951.pdf?src-supplier=Digi-Key, ComponentLink3URL=https://datasheet.ciiva.com/6368/bsc030n03ls-rev1-27-6368951.pdf?src-supplier=Digi-Key, ComponentLink4Description=https://datasheet.ciiva.com/6368/bsc030n03ls-rev1-27-6368952.pdf?src-supplier=Digi-Key, ComponentLink4URL=https://datasheet.ciiva.com/6368/bsc030n03ls-rev1-27-6368952.pdf?src-supplier=Digi-Key, ComponentLink5Description=https://datasheet.ciiva.com/11172/bsc030n03ls-rev1-27-11172568.pdf?src-supplier=Avnet, ComponentLink5URL=https://datasheet.ciiva.com/11172/bsc030n03ls-rev1-27-11172568.pdf?src-supplier=Avnet, ComponentLink6Description=https://datasheet.ciiva.com/11172/bsc030n03ls-rev1-27-11172569.pdf?src-supplier=Avnet, ComponentLink6URL=https://datasheet.ciiva.com/11172/bsc030n03ls-rev1-27-11172569.pdf?src-supplier=Avnet, ComponentLink7Description=https://datasheet.ciiva.com/6368/bsc030n03ls-rev1-27-6368954.pdf?src-supplier=Digi-Key, ComponentLink7URL=https://datasheet.ciiva.com/6368/bsc030n03ls-rev1-27-6368954.pdf?src-supplier=Digi-Key, Contact Plating=Tin, Element Configuration=Single, Fall Time=4.8ns, Halogen Free="Halogen Free", Height=1.1mm, Lead Free="Lead Free", Length=5.35mm, Manufacturer Part Number 1=BSC030N03LS-G, Number of Elements=1, Number of Pins=8, Packaging="Tape and Reel", Radiation Hardening=No, Rds On Max=3mR, REACH SVHC="No SVHC", Rise Time=5.2ns, RoHS=Yes, Stock 1=0, Supplier 1=Digi-Key, Turn-Off Delay Time=29ns, Turn-On Delay Time=7.3ns, Width=6.35mm
T21: "WE-RJ45 LAN Transformer, THT, 10/100/1000 Base-T, Port 1x1, Tab Up", Operating Temperature="-40 to +85degC", ComponentLink1Description=Manufacturer, ComponentLink1URL=http://www.we-online.de, ComponentLink2Description=Datasheet, ComponentLink2URL=https://katalog.we-online.com/pbs/datasheet/7499511440.pdf, Data Rate="10/100/1000 Base-T", LED=green/yellow-green/yellow, Mounting Technology=THT, Packaging=Tray, Part Number=7499511440, PoE="PoE+ (up to 600 mA)", Port Number=1x1, Published Date="July 2019", Publisher="Wurth Elektronik", Shield Tabs=Yes, Tab=Up, USB=No
T22 T23 T27 T30: "MOSFET MOSFT P-Ch -4.3A 50mOhm 10nC Log Lvl", Case/Package=SOT-23, Continuous Drain Current (ID)=4.3A, Current Rating=-4.3A, Drain to Source Breakdown Voltage=-12V, Drain to Source Resistance=50mR, Drain to Source Voltage (Vdss)=12V, Gate to Source Voltage (Vgs)=8V, Input Capacitance=830pF, Manufacturer="International Rectifier", Max Operating Temperature=150°C, Max Power Dissipation=1.3W, Min Operating Temperature=-55°C, Package Quantity=1, Supplier Part Number 1=IRLML6401PBFCT-ND, Threshold Voltage=-550mV, Category=MOSFETs, ComponentLink1Description=https://datasheet.ciiva.com/6131/irlml6401-6131072.pdf?src-supplier=Farnell, ComponentLink1URL=https://datasheet.ciiva.com/6131/irlml6401-6131072.pdf?src-supplier=Farnell, ComponentLink2Description=https://datasheet.ciiva.com/6383/irlml6401pbf-6383328.pdf?src-supplier=Digi-Key, ComponentLink2URL=https://datasheet.ciiva.com/6383/irlml6401pbf-6383328.pdf?src-supplier=Digi-Key, ComponentLink3Description=https://datasheet.ciiva.com/34302/1563711-34302499.pdf?src-supplier=Jameco, ComponentLink3URL=https://datasheet.ciiva.com/34302/1563711-34302499.pdf?src-supplier=Jameco, ComponentLink4Description=https://datasheet.ciiva.com/6383/irlml6401pbf-6383326.pdf?src-supplier=Digi-Key, ComponentLink4URL=https://datasheet.ciiva.com/6383/irlml6401pbf-6383326.pdf?src-supplier=Digi-Key, Dual Supply Voltage=-12V, Element Configuration=Single, Fall Time=210ns, Height=1.02mm, Lead Free="Lead Free", Length=3.04mm, Manufacturer Part Number=IRLML6401TRPBF, Mount="Surface Mount", Nominal Vgs=-550mV, Number of Elements=1, Number of Pins=3, On-State Resistance=50mR, Packaging="Tape and Reel", Power Dissipation=1.3W, Pricing 1="1=0,37000, 10=0,30300, 25=0,27680, 100=0,17380, 250=0,17188, 500=0,16096, 1000=0,10945 (USD)", Radiation Hardening=No, Rds On Max=50mR, REACH SVHC="No SVHC", Rise Time=32ns, RoHS=Yes, Stock 1=90278, Supplier 1=Digi-Key, Termination=SMD/SMT, Turn-Off Delay Time=250ns, Turn-On Delay Time=11ns, Voltage Rating (DC)=-12V, Width=1.4mm
T24 T25 T26 T28 T29 T31 T36: "Trans MOSFET N-CH 8V 6A 3-Pin SOT-23 T/R", Case/Package=SOT-23, Continuous Drain Current (ID)=6A, Drain to Source Voltage (Vdss)=8V, Gate to Source Voltage (Vgs)=5V, Input Capacitance=1.07nF, Manufacturer=Vishay, Max Operating Temperature=150°C, Max Power Dissipation=2.5W, Min Operating Temperature=-55°C, Package Quantity=3000, Power Dissipation=1.3W, Supplier Part Number 1=SI2342DS-T1-GE3CT-ND, Threshold Voltage=800mV, Category=MOSFETs, ComponentLink1Description=https://datasheet.ciiva.com/14905/si2342ds-14905257.pdf?src-supplier=Arrow, ComponentLink1URL=https://datasheet.ciiva.com/14905/si2342ds-14905257.pdf?src-supplier=Arrow, ComponentLink2Description=https://datasheet.ciiva.com/29746/si2342ds-29746581.pdf?src-supplier=Digi-Key, ComponentLink2URL=https://datasheet.ciiva.com/29746/si2342ds-29746581.pdf?src-supplier=Digi-Key, ComponentLink3Description=https://datasheet.ciiva.com/30021/si2342ds-30021814.pdf?src-supplier=Avnet, ComponentLink3URL=https://datasheet.ciiva.com/30021/si2342ds-30021814.pdf?src-supplier=Avnet, Contact Plating=Tin,Matte, Fall Time=25ns, Lead Free="Lead Free", Manufacturer Part Number=SI2342DS-T1-GE3, Mount="Surface Mount", Number of Elements=1, Number of Pins=3, Packaging="Tape and Reel", Pricing 1="1=0,50000, 10=0,42500, 25=0,39640, 100=0,29460, 250=0,27984, 500=0,23000, 1000=0,18695 (USD)", Radiation Hardening=No, Rds On Max=17mR, REACH SVHC="No SVHC", Rise Time=14ns, RoHS=Yes, Stock 1=25972, Supplier 1=Digi-Key, Turn-Off Delay Time=65ns, Turn-On Delay Time=6ns
T34: "MOSFET N-CH 60V 25A LFPAK", Continuous Drain Current (ID)=25A, Drain to Source Resistance=14MR, Drain to Source Voltage (Vdss)=60V, Gate to Source Voltage (Vgs)=20V, Input Capacitance=2.03nF, Manufacturer=Renesas, Max Operating Temperature=150°C, Max Power Dissipation=45W, Min Operating Temperature=-55°C, Package Quantity=1, Supplier Part Number 1=968-RJK0651DPB-00#J5, Category=MOSFETs, ComponentLink1Description=https://datasheet.ciiva.com/16481/r07ds0076ej0200-rjk0651dpb-16481749.pdf?src-supplier=Future+Electronics, ComponentLink1URL=https://datasheet.ciiva.com/16481/r07ds0076ej0200-rjk0651dpb-16481749.pdf?src-supplier=Future+Electronics, Fall Time=6.8ns, Lead Free="Lead Free", Manufacturer Part Number=RJK0651DPB-00#J5, Mount="Surface Mount", Number of Elements=1, Number of Pins=5, Packaging="Tape and Reel", Power Dissipation=45W, Pricing 1="1=1,29000, 10=1,15000, 25=1,11000, 100=0,90000, 250=0,85900, 500=0,73200 (USD)", Radiation Hardening=No, Rds On Max=14mR, Rise Time=4.4ns, RoHS=Yes, Stock 1=1853, Supplier 1=Mouser, Turn-Off Delay Time=42ns, Turn-On Delay Time=8.4ns
T35: "MOSFET 80V 6.2mOhm@10V 60A N-Ch MV T-FET", Continuous Drain Current (ID)=60A, Drain to Source Breakdown Voltage=80V, Drain to Source Resistance=6.2mR, Gate to Source Voltage (Vgs)=20V, Input Capacitance=2.425nF, Manufacturer=Vishay, Max Operating Temperature=150°C, Max Power Dissipation=69.4W, Min Operating Temperature=-55°C, On-State Resistance=9.5MR, Package Quantity=1, Supplier Part Number 1=SIJ482DP-T1-GE3CT-ND, Threshold Voltage=1.5V, Category=MOSFETs, ComponentLink1Description=https://datasheet.ciiva.com/30021/sij482dp-30021697.pdf?src-supplier=Avnet, ComponentLink1URL=https://datasheet.ciiva.com/30021/sij482dp-30021697.pdf?src-supplier=Avnet, ComponentLink2Description=https://datasheet.ciiva.com/4438/sij482dp-104025-4438550.pdf?src-supplier=Mouser, ComponentLink2URL=https://datasheet.ciiva.com/4438/sij482dp-104025-4438550.pdf?src-supplier=Mouser, ComponentLink3Description=https://datasheet.ciiva.com/16486/sij482dp-16486587.pdf?src-supplier=Future+Electronics, ComponentLink3URL=https://datasheet.ciiva.com/16486/sij482dp-16486587.pdf?src-supplier=Future+Electronics, ComponentLink4Description=https://datasheet.ciiva.com/6369/sij482dp-6369549.pdf?src-supplier=Digi-Key, ComponentLink4URL=https://datasheet.ciiva.com/6369/sij482dp-6369549.pdf?src-supplier=Digi-Key, Drain to Source Voltage (Vdss)=80V, Element Configuration=Single, Height=1.14mm, Lead Free="Lead Free", Length=5mm, Manufacturer Part Number=SIJ482DP-T1-GE3, Mount="Through Hole,Surface Mount", Number of Elements=1, Number of Pins=5, Packaging="Tape and Reel", Power Dissipation=69.4W, Pricing 1="1=1,76000, 10=1,58300, 25=1,49360, 100=1,16490, 250=1,13508, 500=0,98572, 1000=0,83636 (USD)", Radiation Hardening=No, Rds On Max=6.2mR, REACH SVHC=Unknown, RoHS=Yes, Stock 1=1756, Supplier 1=Digi-Key, Turn-Off Delay Time=72ns, Turn-On Delay Time=28ns, Width=4.47mm
TP1_I2C_Bridge TP1_I2C_Bridge_2 TP1_I2C_Bridge_3 TP2_I2C_Bridge TP2_I2C_Bridge_2 TP2_I2C_Bridge_3 TP3_I2C_Bridge TP3_I2C_Bridge_2 TP3_I2C_Bridge_3 TP4_I2C_Bridge TP4_I2C_Bridge_2 TP4_I2C_Bridge_3 TP5_I2C_Bridge TP5_I2C_Bridge_2 TP5_I2C_Bridge_3 TP6_I2C_Bridge TP6_I2C_Bridge_2 TP6_I2C_Bridge_3 TP7_I2C_Bridge_2 TP8_I2C_Bridge TP8_I2C_Bridge_2 TP8_I2C_Bridge_3 TP9_I2C_Bridge TP9_I2C_Bridge_2 TP9_I2C_Bridge_3 TP10_I2C_Bridge TP10_I2C_Bridge_2 TP10_I2C_Bridge_3 TP11_I2C_Bridge TP11_I2C_Bridge_2 TP11_I2C_Bridge_3 TP12_I2C_Bridge_2 TP13_I2C_Bridge_2 TP14_I2C_Bridge_2 TP15_I2C_Bridge TP15_I2C_Bridge_2 TP15_I2C_Bridge_3 TP16_I2C_Bridge TP16_I2C_Bridge_2 TP16_I2C_Bridge_3 TP17_I2C_Bridge TP17_I2C_Bridge_2 TP17_I2C_Bridge_3 TP18_I2C_Bridge TP18_I2C_Bridge_2 TP18_I2C_Bridge_3 TP19 TP20 TP33 TP34 TP35 TP36 TP37 TP38 TP39 TP40 TP41 TP42 TP43 TP44 TP45 TP46 TP47 TP48 TP49 TP50_SPI_bridge2 TP50_SPI_bridge3 TP51_SPI_bridge2 TP51_SPI_bridge3 TP52_SPI_bridge2 TP52_SPI_bridge3 TP53_SPI_bridge1 TP53_SPI_bridge2 TP53_SPI_bridge3 TP54_SPI_bridge2 TP55_SPI_bridge2 TP56_SPI_bridge1 TP56_SPI_bridge2 TP56_SPI_bridge3 TP57_SPI_bridge1 TP57_SPI_bridge2 TP57_SPI_bridge3 TP58_SPI_bridge1 TP58_SPI_bridge2 TP58_SPI_bridge3 TP59_SPI_bridge1 TP59_SPI_bridge2 TP59_SPI_bridge3 TP60_U_Translator_I2C1 TP60_U_Translator_I2C2 TP60_U_Translator_I2C3 TP60_U_Translator_I2C4 TP61_U_Translator_I2C1 TP61_U_Translator_I2C2 TP61_U_Translator_I2C3 TP61_U_Translator_I2C4 TP62 TP63 TP64 TP65 TP66 TP67 TP68 TP69 TP70 TP71 TP72 TP73 TP74 TP75 TP76 TP77 TP78 TP79 TP80 TP81 TP82 TP83 TP84 TP85 TP86 TP87 TP88 TP91 TP92: "TEstPoint", Color=Black, Flammability Rating="UL94 V-0", Manufacturer="Keystone Electronics", Manufacturer Part Number=5001, Package Quantity=100, Supplier Part Number 1=36-5001-ND, Body Material=PBT,Bronze, ComponentLink1Description=https://datasheet.ciiva.com/27052/1581986-27052611.pdf?src-supplier=Jameco, ComponentLink1URL=https://datasheet.ciiva.com/27052/1581986-27052611.pdf?src-supplier=Jameco, ComponentLink2Description=https://datasheet.ciiva.com/11836/0900766b8009b7c7-11836045.pdf?src-supplier=RSComponents, ComponentLink2URL=https://datasheet.ciiva.com/11836/0900766b8009b7c7-11836045.pdf?src-supplier=RSComponents, ComponentLink3Description=https://datasheet.ciiva.com/22631/1703983-22631100.pdf?src-supplier=Element14, ComponentLink3URL=https://datasheet.ciiva.com/22631/1703983-22631100.pdf?src-supplier=Element14, ComponentLink4Description=https://datasheet.ciiva.com/16318/m60-2p60-16318423.pdf?src-supplier=Future+Electronics, ComponentLink4URL=https://datasheet.ciiva.com/16318/m60-2p60-16318423.pdf?src-supplier=Future+Electronics, Contact Material=Bronze, Contact Plating=Silver,Tin, Diameter=2.54mm, Height=0.3inch, Hole Diameter=1.6mm, Housing Color=Black, Inside Diameter=1.27mm, Insulation=Insulated, Lead Free="Lead Free", Length=7.62mm, Material=Nylon,Bronze,Silver, Mount="Through Hole,PCB", Number of Contacts=1, Number of Ports=1, Orientation=Straight, Outside Diameter=2.54mm, Packaging=Bulk, Plating=Silver, Pricing 1="1 = 0,35000, 10 = 0,33500, 25 = 0,30800, 100 = 0,30150, 250 = 0,28304, 500 = 0,25230, 1000 = 0,17140, 2500 = 0,15296, 5000 = 0,14340 (USD)", REACH SVHC="No SVHC", RoHS=Yes, Stock 1=352180, Supplier 1=Digi-Key, Termination="Through Hole"
U1: "FPGA Zynq UltraScale+ Family 192150 Cells 20nm Technology 0.85V 900-Pin FCBGA Tray", Case/Package=FCBGA, Frequency=500MHz, Manufacturer=Xilinx, Manufacturer Part Number=XCZU4CG-1FBVB900E, Max Operating Temperature=100°C, Min Operating Temperature=0°C, Supplier Part Number 1=217-CZU4CG-1FBVB900E, ComponentLink1Description=https://www.xilinx.com/support/documentation/data_sheets/ds891-zynq-ultrascale-plus-overview.pdf?src-supplier=Digi-Key, ComponentLink1URL=https://www.xilinx.com/support/documentation/data_sheets/ds891-zynq-ultrascale-plus-overview.pdf?src-supplier=Digi-Key, ComponentLink2Description=https://www.xilinx.com/support/documentation/data_sheets/ds925-zynq-ultrascale-plus.pdf?src-supplier=Digi-Key, ComponentLink2URL=https://www.xilinx.com/support/documentation/data_sheets/ds925-zynq-ultrascale-plus.pdf?src-supplier=Digi-Key, Core Architecture=ARM, Interface=I2C,SPI,USB,Ethernet,MMC,SDIO,SD,UART,USART,EBI/EMI, Number of I/Os=204, Packaging=Tray, Peripherals=WDT,DMA, Pricing 1="1=0,00000, 5=1060,70000 (USD)", RAM Size=256KB, RoHS=No, Stock 1=3, Supplier 1=Mouser, Supplier 2=Avnet, Supplier 3=Digi-Key, Supplier Part Number 2=XCZU4CG-1FBVB900E, Supplier Part Number 3=XCZU4CG-1FBVB900E-ND
U3_I2C_Bridge U3_I2C_Bridge_2 U3_I2C_Bridge_3: "8X I2C Switch", Case/Package=VQFN, Manufacturer="Texas Instruments", Manufacturer Part Number=TCA9548ARGER, Max Operating Temperature=85°C, Max Supply Current=80uA, Max Supply Voltage=5.5V, Min Operating Temperature=-40°C, Min Supply Voltage=1.65V, On-State Resistance=70R, Package Quantity=3000, Supplier Part Number 1=296-39222-1-ND, ComponentLink1Description=https://datasheet.ciiva.com/30010/tca9548a-30010277.pdf?src-supplier=Avnet, ComponentLink1URL=https://datasheet.ciiva.com/30010/tca9548a-30010277.pdf?src-supplier=Avnet, ComponentLink2Description=https://datasheet.ciiva.com/29616/tca9548a-29616682.pdf?src-supplier=Digi-Key, ComponentLink2URL=https://datasheet.ciiva.com/29616/tca9548a-29616682.pdf?src-supplier=Digi-Key, Independent Circuits=1, Lead Free="Lead Free", Mount="Surface Mount", Number of Pins=24, Packaging="Tape and Reel", Pricing 1="1 = 1,55000, 10 = 1,39200, 100 = 1,11890, 500 = 0,91928, 1000 = 0,76169 (USD)", Propagation Delay=1ns, Radiation Hardening=No, REACH SVHC="No SVHC", RoHS=Yes, Stock 1=1611, Supplier 1=Digi-Key, Supply Type=Single, Weight=0.001926oz
U4 U5 U48: Manufacturer 1="Texas Instruments", Supplier Part Number 1=296-53412-1-ND, Manufacturer Part Number 1=TPS2121RUXT, Pricing 1="1=2,46000, 10=2,21100, 100=1,66860 (USD)", RoHS=No, Stock 1=67, Supplier 1=Digi-Key